# Altium PCB 2023.11.07.HMS.PD.V5.PcbDoc (part 2 of 2)
Units mm, origin at the board's own origin, x right, y up, seen from the top; angles counter-clockwise.
Board outline 110 x 110 mm, 2 copper layers (Top Layer, Bottom Layer); 168 components, 117 nets, 606 pads, 1355 vias.
Unrouted connection lines stored in the file: 4.
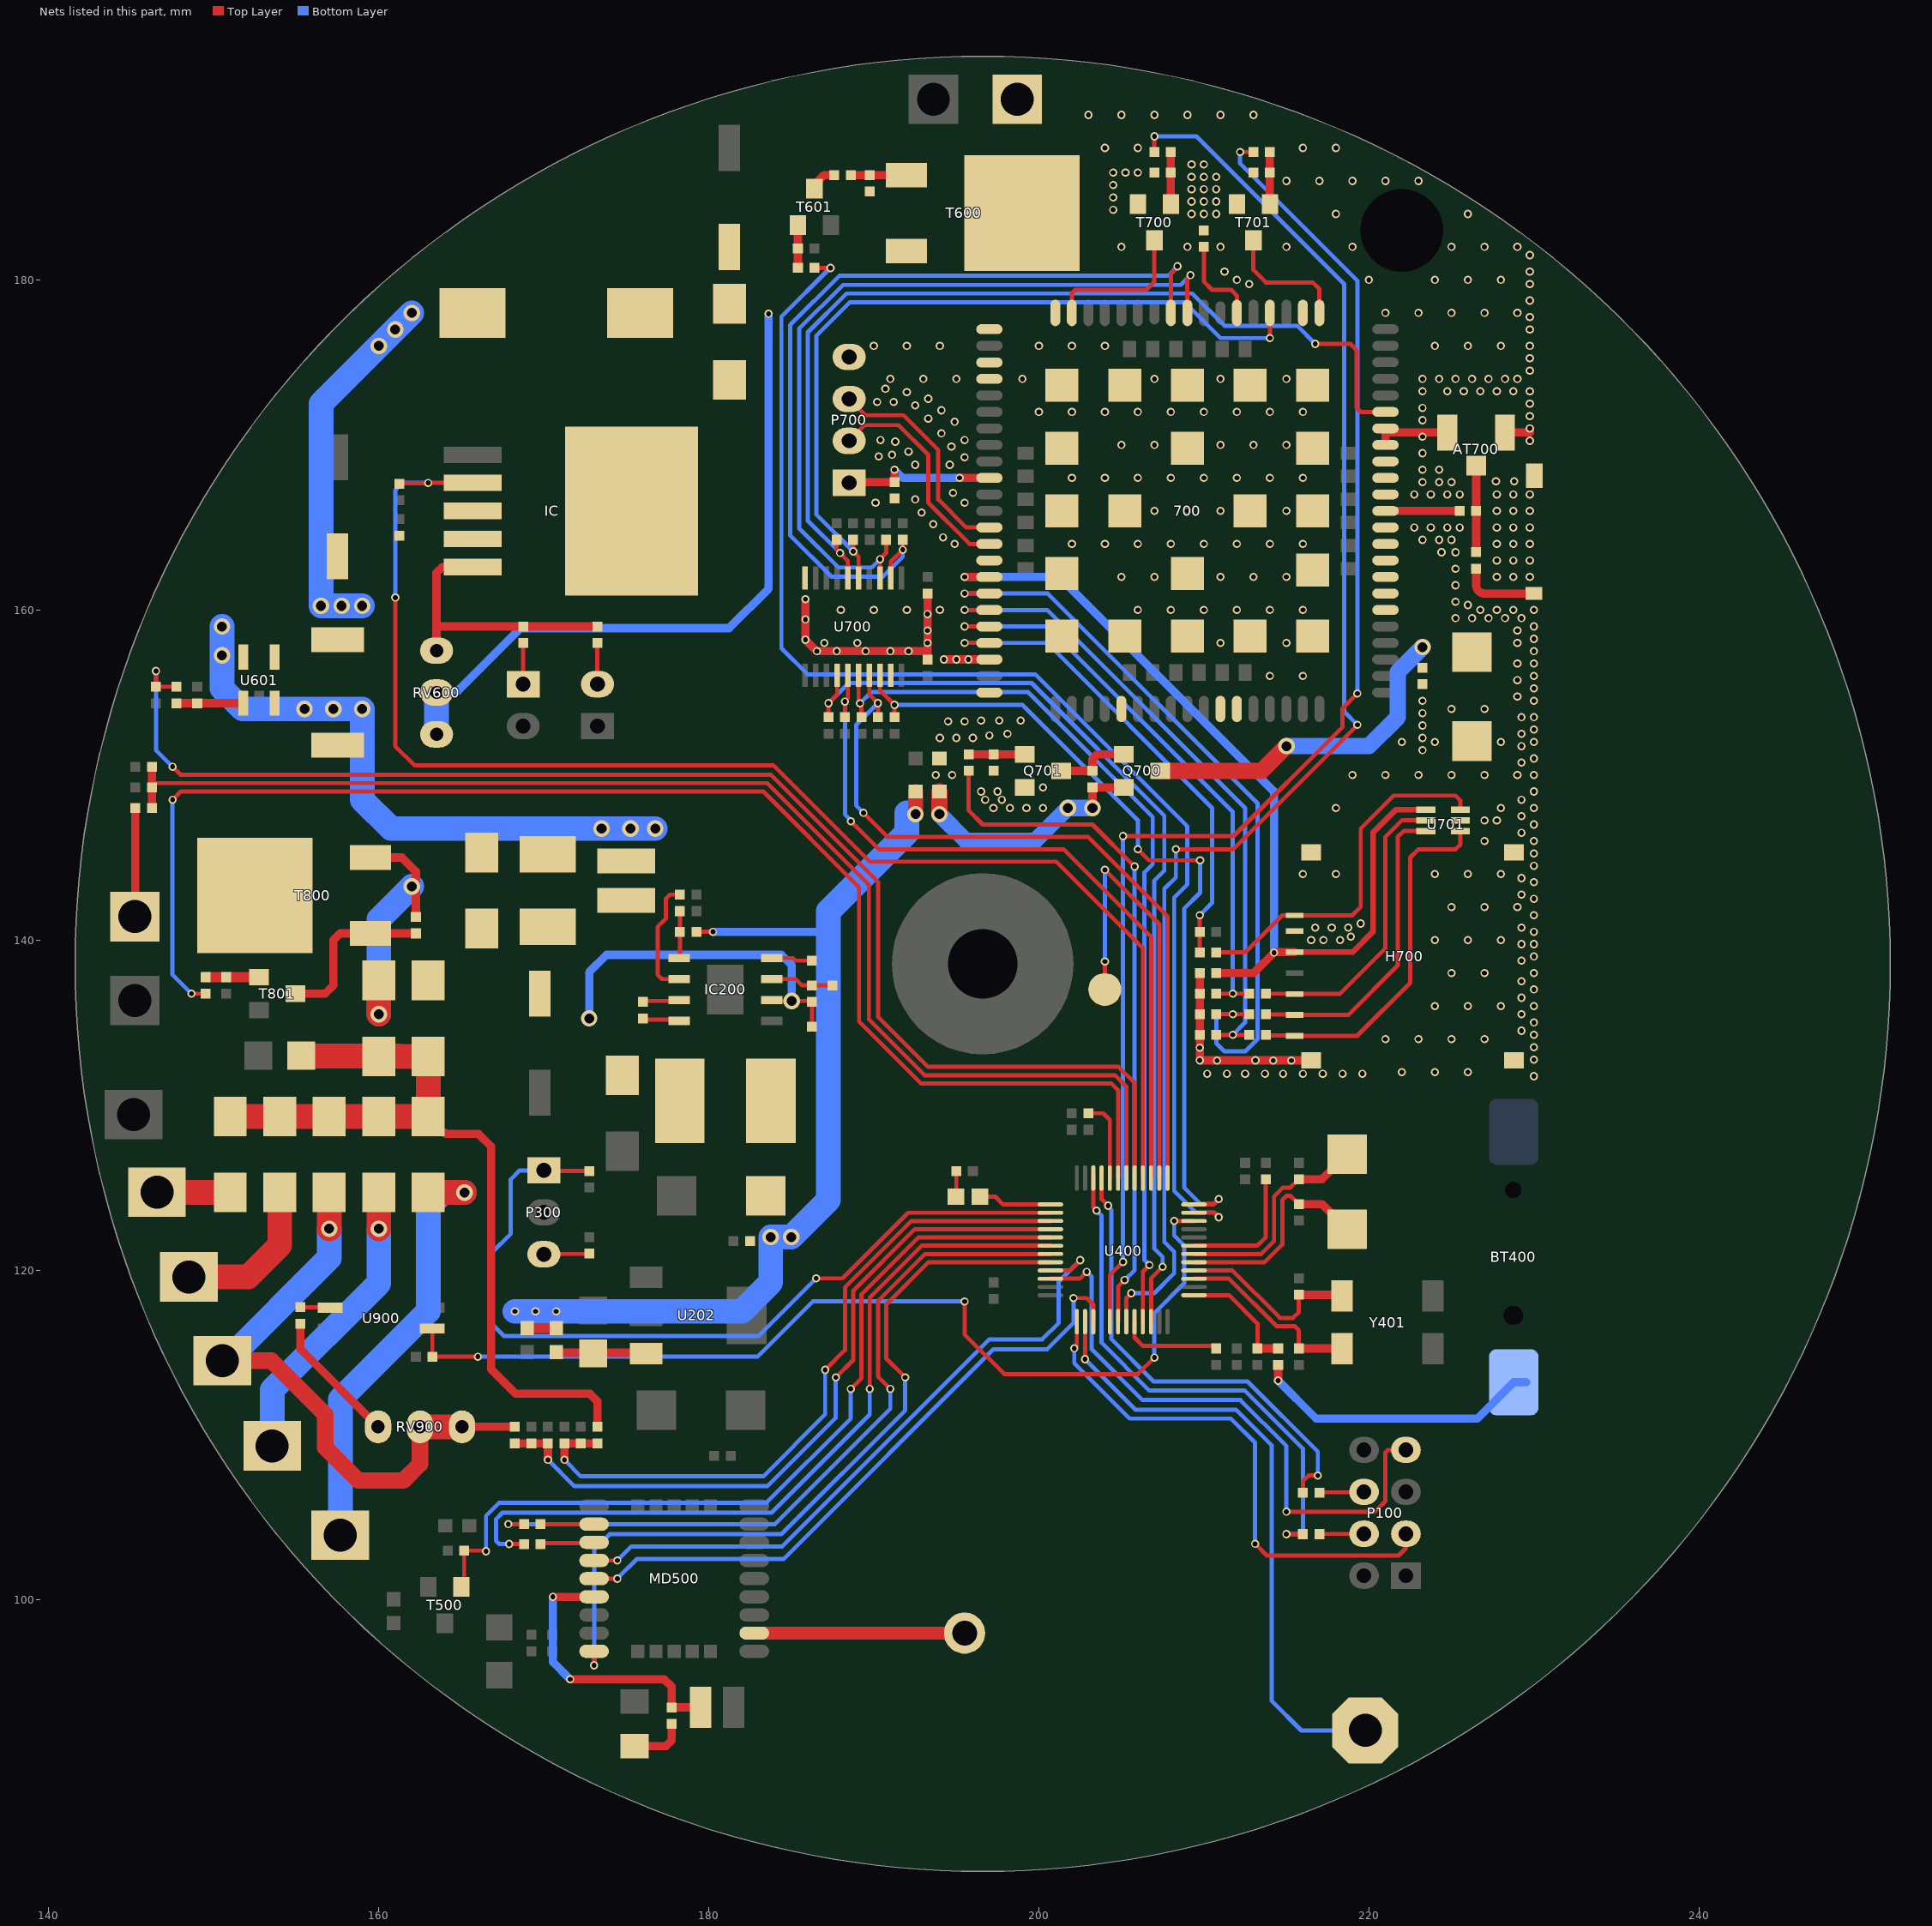
[diagram p2: the nets of this part, all layers, seen from the top]

## Via types
v1: diameter 0.5, hole 0.3, Top Layer to Bottom Layer, tented both sides, 1270 vias
v2: diameter 0.6, hole 0.3, Top Layer to Bottom Layer, tented both sides, 48 vias
v3: diameter 1, hole 0.6, Top Layer to Bottom Layer, tented both sides, 37 vias

## Nets (pads, with @x,y where several pads share a name; then routed paths per layer and width w, separated by ;. In a path a pad name is that pad's centre, name@x,y a point inside that pad or via, vN(x,y) a via of type N, cw(c..) or ccw(c..) an arc to the next point about the centre after c; other vN are vias at no path point) (continued)
GSM.GND: 700.2 700.17 700.18 700.29 700.39 700.45 700.46 700.54 700.58 700.59 700.61 700.62 700.63 700.64 700.65 700.69 700.70 700.71 700.72 700.73 700.74 700.75 700.76 700.77 700.78 700.79 700.80 700.81 700.82 700.83 700.84 700.85 700.86 700.87 700.88 700.89 700.91 700.92 700.94 AT700.2 AT701.2 C701.2 C703.1 C704.1 C705.1 C706.1 C707.1 C708.1 C709.1 C730.2 H700.5 L701.2 P700.4 Q701.2 R700.1 R707.1 R709.2 R711.2 T700.2 T701.2 U700.10 U700.19 U701.2 | length 35.2
  Top Layer w0.5: v1(185.85,160.65) v1(185.85,158.2) v1(186.55,157.5) v1(191,157.5) 193.2,157.5 193.25,157.55 ; C705.1@193.25,157 193.25,157.55 ; C704.1@193.25,161 193.25,157.55 ; v1(194.25,157) 700.92@197,157 ; C706.1@209.75,138 C707.1@209.75,136.75 C709.1@209.75,135.5 C708.1@209.75,134.25 v1(209.75,132.71) H700.5@216.5,132.71 ; 700.64@221,170 221,170.75 AT700.2@224.75,170.75 ; AT700.2@228.25,170.75 229.75,170.75 v1(229.75,171)
  other v1: 230,131.75 210.2,131.9 211.4,131.9 212.5,131.9 213.7,131.9 214.8,131.9 216,131.9 217.2,131.9 218.4,131.9 219.6,131.9 222,132 224,132 226,132 210.8,132.7 214.2,132.7 215.3,132.7 213.125,132.71 230,132.75 209.75,133.48 230,133.5 221,134 223,134 225,134 227,134 230,134.25 229.25,134.5 230,135 229.25,135.5 224,136 226,136 228,136 230,136 229.25,136.5 230,137 229.25,137.5 225,138 227,138 230,138 229.25,138.75 230,139 229.25,139.75 230,139.75 216.5,140 217.25,140 218.25,140 224,140 226,140 228,140 218.9,140.2 230,140.5 216.75,140.75 217.75,140.75 218.75,140.75 229.25,140.75 219.5,141 230,141.5 225,142 227,142 229,142 230,142.5 229.25,142.75 230,143.5 229.25,143.75 216,144 218,144 224,144 226,144 228,144 230,144.5 230,145.25 227,146 230,146 229.25,146.5 230,147 227,147.25 227.75,147.25 229.25,147.5 197.25,148 198.25,148 199.25,148 200.25,148 218,148 228,148 230,148 196.75,148.5 197.75,148.5 229.25,148.5 196.5,149 197.5,149 230,149 200.25,149.25 193.75,150 194.75,150 219,150 221,150 223,150 225,150 227,150 229,150 230,150 229.25,150.75 230,151 223.25,151.5 229.25,151.75 222,152 224,152 228,152 230,152 194,152.25 195,152.25 196,152.25 223.25,152.25 197,152.4 198.1,152.5 229.25,152.5 230,152.75 223.25,153 194.5,153.25 195.5,153.25 196.5,153.3 197.6,153.3 198.9,153.3 229.25,153.5 230,153.5 223.25,153.75 225,154 227,154 223.25,154.5 230,154.5 229,154.75 230,155.25 229,155.75 214,156 216,156 230,156 229,156.75 230,156.75 195,157 195.725,157 187.75,157.5 189.5,157.5 192.1,157.5 230,157.5 187,158 189,158 193.25,158 211,158 215,158 229,158 230,158.25 193.25,158.75 229,158.75 230,159 185.85,159.425 225.25,159.5 226.25,159.5 227.25,159.5 228.25,159.5 229.25,159.5 193.25,159.75 188,160 190,160 192,160 194,160 206,160 208,160 210,160 212,160 214,160 216,160 226.75,160 227.75,160 228.75,160 230,160 226,160.3 225.25,160.5 225.25,161.5 205,162 207,162 211,162 213,162 215,162 227.75,162 228.75,162 229.75,162 225.25,162.5 227.75,163 228.75,163 229.75,163 224.4,163.5 225.25,163.5 194.9,164 202,164 204,164 206,164 208,164 210,164 212,164 214,164 216,164 227.75,164 228.75,164 229.75,164 223.25,164.25 224.25,164.25 225,164.25 194.2,164.4 222.75,165 223.75,165 224.75,165 225.5,165 227.75,165 228.75,165 229.75,165 193.6,165.2 192.9,165.9 207,166 209,166 211,166 215,166 227.75,166 228.75,166 229.75,166 190.1,166.5 195.5,166.5 192.5,166.7 222.75,167 223.75,167 224.75,167 225.5,167 227.75,167 228.75,167 229.75,167 194.8,167.1 223.25,167.75 224.25,167.75 225,167.75 227.7,167.8 228.8,167.8 202,168 204,168 206,168 208,168 210,168 212,168 214,168 216,168 223.25,168.5 224.25,168.5 192.5,168.8 194.6,168.8 195.5,169.25 190.3,169.3 191.1,169.4 223.25,169.5 192.1,169.6 194.7,169.9 205,170 207,170 211,170 213,170 215,170 191.3,170.2 229.75,170.25 190.4,170.3 195.5,170.3 223.25,170.5 194.1,170.7 194.9,171.4 223.25,171.5 193.3,171.6 229.75,171.75 200,172 202,172 204,172 206,172 208,172 210,172 212,172 214,172 216,172 194.1,172.1 223.25,172.25 192.5,172.4 229.75,172.5 190.2,172.6 191.2,172.6 193.3,172.8 192,173.2 223.25,173.25 224.75,173.25 225.75,173.25 226.75,173.25 227.75,173.25 228.75,173.25 229.75,173.25 190.7,173.4 191,174 193,174 195,174 199,174 207,174 211,174 215,174 223.25,174 224.25,174 225.25,174 226.25,174 227.25,174 228.25,174 229,174 229.75,174.5 229.75,175.25 190,176 192,176 194,176 200,176 202,176 204,176 224,176 226,176 228,176 229.75,176 229.75,177 229.75,177.75 221,178 223,178 225,178 227,178 229,178 229.75,178.75 212.75,179.75 229.75,179.75 212,180 220,180 224,180 226,180 228,180 211.25,180.5 229.75,180.5 229.75,181.5 205,182 209,182 211,182 215,182 219,182 225,182 227,182 229,182 209.25,184 210,184 210.75,184 218,184 226,184 204.5,184.25 209.25,184.75 210,184.75 210.75,184.75 204.5,185 209.25,185.5 210,185.5 210.75,185.5 204.5,185.75 215,186 217,186 219,186 221,186 223,186 209.25,186.25 210,186.25 210.75,186.25 204.5,186.5 205.25,186.5 206,186.5 209.25,187 210,187 204,188 206,188 216,188 218,188 203,190 205,190 207,190 209,190 211,190 213,190
GSM.PWR: L700.2 Q700.2 R705.2 | length 15.3
  Top Layer w0.5: v3(203.25,148) 203.25,149.25 Q700.2@205.15,149.25
  Top Layer w1: v3(193.973,147.627) L700.2@193.973,149
  Bottom Layer w1: v3(193.973,147.627) 195.6,146 199.75,146 v3(201.75,148) v3(203.25,148)
GSM.PWRKEY: 700.1 T701.3 | length 7.7
  Top Layer w0.254: T701.3@213,182.4 213,180.6 213.75,179.85 216.6,179.85 217,179.45 700.1@217,178
GSM.RESET: 700.16 T700.3 | length 9
  Top Layer w0.254: 700.16@202,178 202,179.2 202.2,179.4 206.5,179.4 207,179.9 T700.3@207,182.4
GSM.RI: 700.4 R717.1 U700.5 | length 47.2
  Top Layer w0.254: R717.1@188.75,164.25 v1(188.75,163.55) 189.075,163.225 U700.5@189.075,161.95 ; v1(214,176.475) 700.4@214,178
  Bottom Layer w0.254: v1(188.75,163.55) 186.525,165.775 186.525,176.628 188.547,178.65 208.828,178.65 211.003,176.475 v1(214,176.475)
GSM.Status: 700.66 R718.1 U700.6 | length 57.8
  Top Layer w0.254: R718.1@187.75,164.25 187.75,163.65 v1(187.95,163.45) 188.425,162.975 U700.6@188.425,161.95 ; v1(216.75,176.125) 218.875,176.125 219.25,175.75 219.25,172.25 219.5,172 700.66@221,172
  Bottom Layer w0.254: v1(187.95,163.45) 186,165.4 186,176.825 188.35,179.175 209.3,179.175 211.25,177.225 215.65,177.225 v1(216.75,176.125)
GSM.VBAT: 700.55 700.56 700.57 C703.2 C730.1 Q700.3 | length 20.6
  Top Layer w1: Q700.3@207.35,150.25 213.5,150.25 v3(215,151.75)
  Bottom Layer w1: v3(215,151.75) 220,151.75 221.75,153.5 221.75,156.25 v3(223.25,157.75)
LED: D400.2 U400.25 | length 4.5
  Top Layer w0.254: D400.2@196.425,124.45 197.35,124.45 197.825,123.975 U400.25@200.7,123.975
LED_PWR: C600.1 D600.2 R602.2 RV600.2 RV600.3 T600.3 | length 41.9
  Bottom Layer w0.5: RV600.2@163.5,155 163.596,155.096 164.796,155.096 168.6,158.9 181.225,158.9 183.625,161.3 v1(183.625,177.95)
  Bottom Layer w1.5: RV600.3@163.5,152.46 RV600.2@163.5,155
LED_VCC: C601.2 C602.1 IC.4 L601.1 R603.2 U601.4 | length 22.5
  Bottom Layer w1.5: v3(159,160.25) v3(157.75,160.25) v3(156.5,160.25) 156.5,172.5 v3(162,178)
  other v3: 160,176 161,177
Net700_60: 700.60 C700.2 | length 4.5
  Top Layer w0.5: 700.60@221,166 C700.2@225.5,166
Net`_2: `.2 P300.3 | length 2.8
  Top Layer w0.254: P300.3@170,120.96 170.02,120.98 172.73,120.98 `.2@172.75,121
NetAT500_1: AT500.1 MD500.11 | length 12.8
  Top Layer w0.8: MD500.11@182.75,98 AT500.1@195.5,98
NetAT700_1: AT700.1 C700.1 R777.2 | length 8
  Top Layer w0.35: C700.1@226.5,166 AT700.1@226.5,168.75
  Top Layer w0.5: R777.2@226.5,163.5 C700.1@226.5,166 AT700.1@226.5,168.75
NetAT701_1: AT701.1 R777.1 | length 4.8
  Top Layer w0.5: R777.1@226.5,162.5 226.5,161.5 ccw(c227,161.5) 227,161 AT701.1@230,161
NetC200_1: C200.1 D200.2 IC200.8 L201.1 | length 2.3
  Top Layer w0.254: C200.1@176,135.25 176.077,135.173 178.119,135.173 IC200.8@178.196,135.095
NetC200_2: C200.2 IC200.7 | length 2.2
  Top Layer w0.254: C200.2@176,136.25 176.057,136.308 178.139,136.308 IC200.7@178.196,136.365
NetC201_2: C201.2 L202.2 U202.3 | length 5.5
  Top Layer w0.5: L202.2@170.75,115.027 170.789,114.989 176.163,114.989 U202.3@176.202,114.95
NetC204_1: C204.1 C205.2 IC200.2 L200.2 R200.2 | length 21.9
  Top Layer w0.254: IC200.2@183.803,136.365 183.861,136.307 v3(185.027,136.307) 186.192,136.307 R200.2@186.25,136.25 C205.2@186.25,134.75
  Bottom Layer w0.5: v3(172.75,135.25) 172.75,138.05 173.8,139.1 184.4,139.1 185.027,138.473 v3(185.027,136.307)
NetC503_1: C503.1 MD500.6 R502.1 | length 17.3
  Top Layer w0.5: v1(170.55,100.2) MD500.6@173.05,100.2 ; v1(171.6,95.2) 177.3,95.2 177.75,94.75 R502.1@177.75,93.5 C503.1@179.5,93.5
  Bottom Layer w0.5: v1(170.55,100.2) 170.55,96.25 v1(171.6,95.2)
NetC603_2: C603.2 R606.2 U400.17 | length 85.2
  Top Layer w0.254: v1(146.5,156.3) C603.2@146.5,155.35 R606.2@147.75,155.35 ; v1(147.5,150.5) 147.984,150.016 148.4,150.016 183.484,150.016 183.759,150.016 190.25,143.525 190.25,135.35 193.284,132.316 204.821,132.316 205.8,131.337 U400.17@205.8,125.575
  Bottom Layer w0.254: v1(146.5,156.3) 146.5,151.5 v1(147.5,150.5)
NetC801_2: C801.2 R800.1 R803.2 U400.27 | length 43.1
  Top Layer w0.254: v1(187.052,113.952) 188.25,115.15 188.25,118.943 192.282,122.975 U400.27@200.7,122.975
  Top Layer w0.5: v1(171.25,108.5) R803.2@171.25,109.5 R800.1@173.25,109.5
  Bottom Layer w0.254: v1(171.25,108.5) 172.25,107.5 183.3,107.5 187.052,111.252 v1(187.052,113.952)
NetC803_2: C803.2 R802.1 R804.2 U400.18 | length 79.5
  Top Layer w0.254: R804.2@146.25,149.508 182.992,149.508 183.542,149.508 189.7,143.35 189.7,135.182 193.074,131.808 204.61,131.808 205.3,131.118 U400.18@205.3,125.575
  Top Layer w0.5: R802.1@146.25,148 146.25,148.5 146.25,149.508 C803.2@146.25,150.5
NetC900_2: C900.2 R900.1 R901.2 U400.28 | length 44.5
  Top Layer w0.254: v1(187.696,113.496) 188.75,114.55 188.75,118.736 192.489,122.475 U400.28@200.7,122.475
  Top Layer w0.5: R900.1@168.25,109.5 R901.2@170.25,109.5 v1(170.25,108.5)
  Bottom Layer w0.254: v1(170.25,108.5) 171.85,106.9 183.549,106.9 187.696,111.048 v1(187.696,113.496)
NetD400_1: D400.1 R404.2 | length 1.6
  Top Layer w0.254: D400.1@194.975,124.45 195,124.475 R404.2@195,126
NetD500_2: D500.2 R502.2 | length 3.4
  Top Layer w0.5: D500.2@175.5,91.15 177.4,91.15 177.75,91.5 R502.2@177.75,92.5
NetD600_1: D600.1 IC.3 IC.6 L601.2
NetD800_2: D800.2 R801.2 T800.3 | length 16.5
  Top Layer w0.5: T800.3@159.5,145 161.4,145 162.25,144.15 R801.2@162.25,141.4
  Top Layer w1.5: v3(160,135.5) D800.2@160,137.55
  Bottom Layer w1.5: v3(160,135.5) 160,141.25 v3(162,143.25)
NetD900_1: D900.1 T900.1 | length 4.4
  Top Layer w1.5: T900.1@146.558,124.714 146.565,124.707 150.993,124.707 D900.1@151,124.7
NetD902_1: D902.1 T901.1 | length 9.5
  Top Layer w1.5: T901.1@148.488,119.583 152.083,119.583 154,121.5 D902.1@154,124.7
NetD905_1: D905.1 T903.1 | length 18
  Top Layer w1.5: v3(160,122.5) D905.1@160,124.7
  Bottom Layer w1.5: T903.1@153.543,109.347 153.543,112.743 160,119.2 v3(160,122.5)
NetD906_1: D906.1 T904.1 | length 26.9
  Top Layer w1.5: D906.1@163,124.7 v3(165.2,124.7)
  Bottom Layer w1.5: T904.1@157.671,103.937 157.671,112.17 163,117.5 163,123.821 163.879,124.7 v3(165.2,124.7)
NetH700_2: H700.2 R712.2 U701.5 | length 18
  Top Layer w0.254: R712.2@213.75,136.75 215.48,136.75 H700.2@215.5,136.73 218.23,136.73 221,139.5 221,146.25 222,147.25 U701.5@223.45,147.25
NetH700_3: H700.3 R713.2 U701.1 | length 21.9
  Top Layer w0.254: R713.2@213.75,134.25 213.78,134.22 215.47,134.22 H700.3@215.5,134.19 219.282,134.19 222.5,137.408 222.5,145 223,145.5 225.25,145.5 225.55,145.8 U701.1@225.55,146.6
NetH700_7: H700.7 R715.2 U701.6 | length 18.9
  Top Layer w0.254: R715.2@213.75,135.5 213.77,135.48 215.48,135.48 H700.7@215.5,135.46 218.756,135.46 221.75,138.454 221.75,146.25 222.1,146.6 U701.6@223.45,146.6
NetH700_8: H700.8 R714.2 U701.3 | length 22.2
  Top Layer w0.254: R714.2@210.75,139.25 212.5,139.25 214.74,141.49 H700.8@215.5,141.49 218.99,141.49 219.5,142 219.5,146.75 221.5,148.75 225.25,148.75 225.55,148.45 U701.3@225.55,147.9
NetIC200_3: IC200.3 R200.1 R201.2 | length 3.9
  Top Layer w0.254: IC200.3@183.803,137.635 185.265,137.635 185.65,137.25 R201.2@187.5,137.25
NetIC200_4: IC200.4 R204.2 | length 2.5
  Top Layer w0.254: IC200.4@183.803,138.905 185.095,138.905 185.25,138.75 R204.2@186.25,138.75
NetIC200_5: IC200.5 R202.1 R203.2 | length 2.9
  Top Layer w0.254: IC200.5@178.196,138.905 178.25,138.959 R203.2@178.25,141.75
NetIC200_6: IC200.6 R205.2 | length 7.2
  Top Layer w0.254: IC200.6@178.139,137.692 IC200.6@178.196,137.635 177.165,137.635 176.9,137.9 176.9,140.8 177.4,141.3 177.4,142.5 177.65,142.75 R205.2@178.25,142.75
NetIC_2: IC.2 R620.2 U400.16 | length 86.4
  Top Layer w0.254: v1(161,160.75) 161,151.75 162.175,150.575 183.925,150.575 189.75,144.75 201.05,144.75 206.3,139.5 U400.16@206.3,125.575 ; R620.2@161.25,167.65 161.275,167.675 162.975,167.675 v1(163,167.7) IC.2@165.685,167.7
  Bottom Layer w0.254: v1(161,160.75) 161,167.25 161.45,167.7 v1(163,167.7)
NetIC_5: IC.5 R600.2 R601.2 RV600.1 | length 17.1
  Top Layer w0.5: RV600.1@163.5,157.54 163.5,159 ; IC.5@165.435,162.35 IC.5@165.685,162.6 163.85,162.6 163.5,162.25 163.5,159 ; R600.2@173.25,159 163.5,159
NetMD500_2: MD500.2 R500.1 | length 3.3
  Top Layer w0.254: R500.1@169.8,104.6 MD500.2@173.05,104.6
NetMD500_3: MD500.3 R501.1 | length 3.3
  Top Layer w0.254: R501.1@169.8,103.4 169.85,103.45 173,103.45 MD500.3@173.05,103.5
NetMD500_4: MD500.4 U400.33 | length 40.5
  Top Layer w0.254: MD500.4@173.05,102.4 v1(174.457,102.4) ; U400.33@200.7,119.975 201.875,119.975 v1(202.5,120.6)
  Bottom Layer w0.254: v1(174.457,102.4) 175.307,103.25 184.45,103.25 197,115.8 200.2,115.8 201.2,116.8 201.2,119.3 v1(202.5,120.6)
NetMD500_5: MD500.5 U400.39 | length 39.4
  Top Layer w0.254: MD500.5@173.05,101.3 v1(174.457,101.3) ; v1(202.1,118.3) 202.9,118.3 203.3,117.9 U400.39@203.3,116.875
  Bottom Layer w0.254: v1(174.457,101.3) 175.657,102.5 184.549,102.5 197.249,115.2 200.5,115.2 202.1,116.8 v1(202.1,118.3)
NetMD500_9: MD500.9 U400.32 | length 48.2
  Top Layer w0.254: v1(173.05,96.05) MD500.9@173.05,96.9 ; v1(191.9,113.496) 190.75,114.646 190.75,117.907 193.318,120.475 U400.32@200.7,120.475
  Bottom Layer w0.254: v1@173.05,95.95 v1(173.05,96.05) 173.05,103.05 174,104 184.4,104 191.9,111.5 v1(191.9,113.496)
NetP100_3: P100.3 U400.37 | length 32.2
  Top Layer w0.254: v1(202.146,115.254) 202.3,115.407 U400.37@202.3,116.875 ; v1(213.1,103.408) 213.808,102.7 221.8,102.7 222.24,103.14 P100.3@222.24,104.02
  Bottom Layer w0.254: v1(202.146,115.254) 202.146,114.354 205.5,111 211.635,111 213.1,109.535 v1(213.1,103.408)
NetP100_4: P100.4 R102.1 | length 2.7
  Top Layer w0.254: R102.1@217,104 217.01,104.01 219.69,104.01 P100.4@219.7,104.02
NetP100_6: P100.6 R100.1 | length 2.7
  Top Layer w0.254: R100.1@217,106.5 217.03,106.53 219.67,106.53 P100.6@219.7,106.56
NetP100_7: P100.7 U400.34 | length 35.9
  Top Layer w0.254: U400.34@200.7,119.475 202.475,119.475 v1(202.896,119.896) ; v1(215,105.354) 220.354,105.354 221,106 221,108.951 221.149,109.1 P100.7@222.24,109.1
  Bottom Layer w0.254: v1(202.896,119.896) 203.2,119.591 203.2,115.2 206.275,112.125 212.208,112.125 215,109.333 v1(215,105.354)
NetP300_1: P300.1 R300.1 U400.26 | length 51.4
  Top Layer w0.254: P300.1@170,126.04 170.04,126 R300.1@172.75,126 ; v1(186.5,119.5) 188.1,119.5 192.075,123.475 U400.26@200.7,123.475
  Bottom Layer w0.254: P300.1@170,126.04 168.54,126.04 168,125.5 168,122.2 166.9,121.1 166.9,116.7 167.6,116 183,116 v1(186.5,119.5)
NetP600_1: P600.1 T600.2
NetP601_2: P601.2 R600.1 | length 2.5
  Top Layer w0.254: P601.2@173.25,155.5 R600.1@173.25,158
NetP602_1: P602.1 R601.1 | length 2.5
  Top Layer w0.254: P602.1@168.75,155.5 R601.1@168.75,158
NetQ700_1: Q700.1@205.15,151.25 Q701.3 R705.1 | length 4.6
  Top Layer w0.5: Q701.3@201.35,150.25 203.25,150.25 203.25,150.957 203.543,151.25 Q700.1@205.15,151.25
NetQ701_1: Q701.1@199.15,151.25 R706.1 R707.2 | length 3.4
  Top Layer w0.5: R706.1@195.75,151.25 197.25,151.25 Q701.1@199.15,151.25
NetR100_2: R100.2 U400.21 | length 28.5
  Top Layer w0.254: U400.21@203.8,125.575 203.8,124.3 v1(204.2,123.9) ; R100.2@216,106.5 216,107.2 216.35,107.55 v1(216.9,107.55)
  Bottom Layer w0.254: v1(204.2,123.9) 204.2,123.833 204.4,123.633 204.4,115.809 206.959,113.25 212.65,113.25 216.9,109 v1(216.9,107.55)
NetR102_2: R102.2 U400.22 | length 32
  Top Layer w0.254: U400.22@203.3,125.575 203.3,123.8 v1(203.5,123.6) ; v1(215,104) R102.2@216,104
  Bottom Layer w0.254: v1(203.5,123.6) 203.8,123.3 203.8,115.6 206.7,112.7 212.482,112.7 216,109.182 216,104.3 215.7,104 v1(215,104)
NetR400_2: R400.2 U400.44 | length 6.1
  Top Layer w0.254: U400.44@205.8,116.875 205.8,115.9 206.3,115.4 R400.2@210.75,115.4
NetR401_1: R401.1 U400.7 | length 8.1
  Top Layer w0.254: U400.7@209.4,121.475 213.225,121.475 213.75,122 R401.1@213.75,125.5
NetR402_2: R402.2 R403.2 U400.1 | length 7.3
  Top Layer w0.254: U400.1@209.4,118.475 211.525,118.475 213.25,116.75 R403.2@213.25,115.25
  Top Layer w0.5: R403.2@213.25,115.25 R402.2@214.5,115.25
NetR405_2: R405.2 U400.20 | length 5
  Top Layer w0.254: R405.2@203,129.5 203.9,129.5 204.3,129.1 U400.20@204.3,125.575
NetR500_2: R500.2 U400.31 | length 45.5
  Top Layer w0.254: v1(167.85,104.6) R500.2@168.8,104.6 ; v1(191,112.8) 190.25,113.55 190.25,118.114 193.111,120.975 U400.31@200.7,120.975
  Bottom Layer w0.254: v1(167.85,104.6) 184,104.6 191,111.6 v1(191,112.8)
NetR501_2: R501.2 U400.30 | length 47.7
  Top Layer w0.254: v1(167.9,103.4) R501.2@168.8,103.4 ; v1(189.75,112.8) 189.75,118.322 192.903,121.475 U400.30@200.7,121.475
  Bottom Layer w0.254: v1(167.9,103.4) 167.3,103.4 167.1,103.6 167.1,104.9 167.5,105.3 183.8,105.3 189.75,111.25 v1(189.75,112.8)
NetR503_1: R503.1 T500.1@165,100.8 U400.29 | length 51
  Top Layer w0.254: T500.1@165,100.8 165.175,100.975 R503.1@165.175,103 v1@166.5,103 ; v1(188.6,112.8) 189.25,113.45 189.25,118.529 192.696,121.975 U400.29@200.7,121.975
  Bottom Layer w0.254: v1(166.5,102.962) 166.5,105.1 167.3,105.9 183.5,105.9 188.6,111 v1(188.6,112.8)
NetR602_1: R602.1 R608.1 T600.1 | length 3.4
  Top Layer w0.5: R608.1@188.6,186.35 R602.1@189.75,186.35 T600.1@191.968,186.35
NetR604_1: R604.1 U400.11 | length 81.7
  Top Layer w0.254: R604.1@186.4,180.725 v1(187.375,180.725) ; U400.11@209.4,123.475 210.625,123.475 v1(210.9,123.2)
  Bottom Layer w0.254: v1(187.375,180.725) 187.35,180.725 184.4,177.775 184.4,157.675 185.975,156.1 199.775,156.1 209,146.875 209,143.375 208.2,142.575 208.2,124.8 209.5,123.5 210.6,123.5 v1(210.9,123.2)
NetR604_2: R604.2 R605.2 T601.1@185.4,183.325 | length 2.6
  Top Layer w0.5: R604.2@185.4,180.725 R605.2@185.4,181.9 T601.1@185.4,183.325
NetR606_1: R606.1 R607.2 U601.1 | length 4
  Top Layer w0.5: R606.1@147.75,154.35 R607.2@149,154.35 U601.1@151.8,154.35
NetR608_2: R608.2 T601.3 | length 1.7
  Top Layer w0.5: T601.3@186.4,185.525 186.4,185.775 186.975,186.35 R608.2@187.6,186.35
NetR703_1: R703.1 U400.12 U700.18 | length 50.9
  Top Layer w0.254: U700.18@190.375,156.05 190.375,155.125 v1(191.25,154.25) R703.1@191.25,153.5 ; v1(206,145.5) 206.67,144.83 v1(209.77,144.83) ; U400.12@209.4,123.975 210.575,123.975 v1(210.9,124.3)
  Bottom Layer w0.254: v1(191.25,154.25) 199.009,154.25 206,147.259 v1(206,145.5) ; v1(209.77,144.83) 209.77,142.87 208.8,141.9 208.8,125 209.8,124 210.6,124 v1(210.9,124.3)
NetR704_1: R704.1 U400.13 U700.17 | length 47
  Top Layer w0.254: v1(189.369,147.706) 190.825,146.25 202.975,146.25 207.8,141.425 U400.13@207.8,125.575 ; U700.17@189.725,156.05 189.725,154.875 v1(190.25,154.35) R704.1@190.25,153.5
  Bottom Layer w0.254: v1(189.369,147.706) 189.369,147.709 188.925,148.154 188.925,153.025 v1(190.25,154.35)
NetR706_2: R706.2 U400.42 | length 41.8
  Top Layer w0.254: R706.2@195.75,150.25 195.75,147.85 196.6,147 203.25,147 v1(205.8,144.45) ; U400.42@204.8,116.875 204.8,119 v1(205.2,119.4)
  Bottom Layer w0.254: v1(205.2,119.4) 205.8,120 v1(205.8,144.45)
NetR708_1: R708.1 R709.1 T700.1@208,184.6 | length 3.1
  Top Layer w0.5: T700.1@208,184.6 R709.1@208,186.5 R708.1@208,187.75
NetR708_2: R708.2 U400.43 | length 88.5
  Top Layer w0.254: U400.43@205.3,116.875 205.3,118.3 v1(205.6,118.6) ; R708.2@207,187.75 v1(207,188.7) ; v1(208.3,145.5) 211.778,145.5 219.3,153.022 v1(219.3,153.039)
  Bottom Layer w0.254: v1(205.6,118.6) 207,118.6 208.2,119.8 208.2,121.1 207.6,121.7 207.6,143.1 208.3,143.8 v1(208.3,145.5) ; v1(207,188.7) 209.55,188.7 218.5,179.75 218.5,153.839 v1(219.3,153.039)
NetR710_1: R710.1 R711.1 T701.1@214,184.6 | length 3.1
  Top Layer w0.5: T701.1@214,184.6 R710.1@214,187.75
NetR710_2: R710.2 U400.41 | length 84.8
  Top Layer w0.254: U400.41@204.3,116.875 204.3,119.7 v1(205.1,120.5) ; v1(205.1,146.3) 211.8,146.3 218.4,152.9 218.4,154.039 v1(219.3,154.939) ; v1(212.193,187.75) R710.2@213,187.75
  Bottom Layer w0.254: v1(205.1,120.5) v1(205.1,146.3) ; v1(212.193,187.75) 212.193,187.057 219.3,179.95 v1(219.3,154.939)
NetR720_1: R720.1 U400.45 U700.16 | length 54.9
  Top Layer w0.254: U700.16@189.075,156.05 189.075,154.425 189.25,154.25 R720.1@189.25,153.5 ; U400.45@206.3,116.875 206.3,119.9 v1(206.7,120.3)
  Bottom Layer w0.254: v1(189.163,154.338) 189.85,155.025 199.33,155.025 206.9,147.455 206.9,144.6 206.4,144.1 206.4,120.6 v1(206.7,120.3)
NetR721_1: R721.1 U400.15 U700.15 | length 45.7
  Top Layer w0.254: R721.1@188.25,153.5 v1(188.25,154.45) 188.425,154.625 U700.15@188.425,156.05 ; v1(188.61,147.19) 190.3,145.5 201.5,145.5 206.8,140.2 U400.15@206.8,125.575
  Bottom Layer w0.254: v1(188.25,154.45) 188.25,147.617 188.61,147.256 v1(188.61,147.19)
NetR722_1: R722.1 U400.46 U700.14 | length 58.4
  Top Layer w0.254: R722.1@187.25,153.5 v1(187.25,154.35) 187.775,154.875 U700.14@187.775,156.05 ; U400.46@206.8,116.875 206.8,119.5 v1(207.5,120.2)
  Bottom Layer w0.254: v1(187.25,154.35) 188.475,155.575 199.558,155.575 207.6,147.533 207.6,144.2 207,143.6 207,121.3 207.5,120.8 v1(207.5,120.2)
NetR801_1: R801.1 T800.1 T801.3 | length 10.4
  Top Layer w0.5: T801.3@154.95,136.75 156.75,136.75 157.25,137.25 157.25,140 157.65,140.4 T800.1@159.5,140.4 R801.1@162.25,140.4
NetR805_1: R805.1 U400.19 | length 88.2
  Top Layer w0.254: v1(147.5,148.5) 148,149 148.4,149 182.5,149 183.3,149 189.1,143.2 189.1,135.063 192.863,131.3 204.4,131.3 204.8,130.9 U400.19@204.8,125.575 ; v1(148.65,136.75) R805.1@149.5,136.75
  Bottom Layer w0.254: v1(147.5,148.5) 147.5,137.9 v1(148.65,136.75)
NetR805_2: R805.2 R806.2 T801.1@152.75,137.75 | length 3.3
  Top Layer w0.6: R805.2@149.5,137.75 R806.2@150.75,137.75 T801.1@152.75,137.75
NetR902_2: R902.2 U400.10 U900.3 | length 60.6
  Top Layer w0.254: U900.3@163.246,116.448 163.25,116.444 R902.2@163.25,114.75 v1(166,114.75) ; v1(195.5,118.1) 195.5,116.1 197.9,113.7 206,113.7 v1(207,114.7) ; v1(208.2,122.975) U400.10@209.4,122.975
  Bottom Layer w0.254: v1(166,114.75) 182.95,114.75 186.3,118.1 v1(195.5,118.1) ; v1@207,114.8 207,117.4 208.8,119.2 208.8,121.5 208.2,122.1 v1(208.2,122.975)
NetR905_1: R905.1 U900.1 | length 1.8
  Top Layer w0.254: R905.1@155.25,117.75 155.266,117.734 157.03,117.734 U900.1@157.046,117.718
NetR905_2: R905.2 RV900.1 | length 8.2
  Top Layer w0.5: R905.2@155.25,116.75 155.25,115.21 RV900.1@159.96,110.5
NetT300_1: T300.1 U400.38 | length 37.6
  Top Layer w0.254: v1(202.8,114.6) U400.38@202.8,116.875
  Bottom Layer w0.254: v1(202.8,114.6) 205.875,111.525 211.959,111.525 214.1,109.384 214.1,93.9 215.9,92.1 T300.1@219.775,92.1
NetT400_1: T400.1 U400.14 | length 27.3
  Top Layer w0.254: T400.1@204,137 v1(204,138.7) ; v1(204,144.25) 207.3,140.95 U400.14@207.3,125.575
  Bottom Layer w0.254: v1(204,138.7) v1(204,144.25)
OSC32I: C403.2 U400.3 Y401.1 | length 11.4
  Top Layer w0.254: U400.3@209.4,119.475 211.525,119.475 214.4,116.6 215.5,116.6 215.75,116.35 C403.2@215.75,115.25
  Top Layer w0.5: C403.2@215.75,115.25 218.35,115.25 Y401.1@218.375,115.225
OSC32O: C404.2 U400.4 Y401.4 | length 11.4
  Top Layer w0.254: U400.4@209.4,119.975 211.732,119.975 214.607,117.1 215.4,117.1 215.75,117.45 C404.2@215.75,118.5
  Top Layer w0.5: C404.2@215.75,118.5 218.3,118.5 Y401.4@218.375,118.425
OSCI: C401.2 U400.5 Y400.1 | length 13.4
  Top Layer w0.254: U400.5@209.4,120.475 213.682,120.475 214.75,121.543 214.75,124.25 215,124.5 215.25,124.5 C401.2@215.75,124
  Top Layer w0.5: C401.2@215.75,124 217.15,124 Y400.1@218.675,122.475
OSCO: C400.2 U400.6 Y400.2 | length 13.4
  Top Layer w0.254: U400.6@209.4,120.975 213.475,120.975 214.25,121.75 214.25,124.457 214.793,125 215.25,125 C400.2@215.75,125.5
  Top Layer w0.5: C400.2@215.75,125.5 217.15,125.5 Y400.2@218.675,127.025
SIM.CLK: 700.32 C708.2 R713.1 | length 39.5
  Top Layer w0.254: v1(195.5,160) 700.32@197,160 ; C708.2@210.75,134.25 v1(211.75,134.25) R713.1@212.75,134.25
  Bottom Layer w0.254: v1(195.5,160) 200.5,160 212.5,148 212.5,135 v1(211.75,134.25)
SIM.DATA: 700.31 C709.2 R715.1 | length 46.4
  Top Layer w0.254: v1(195.5,161) 700.31@197,161 ; C709.2@210.75,135.5 v1(211.75,135.5) R715.1@212.75,135.5
  Bottom Layer w0.254: v1(195.5,161) 200.543,161 213.25,148.293 213.25,134 212.5,133.25 211.25,133.25 210.75,133.75 210.75,135.25 211,135.5 v1(211.75,135.5)
SIM.DET: 700.34 R714.1 R716.1 | length 29.7
  Top Layer w0.254: v1(195.5,158) 700.34@197,158 ; R714.1@209.75,139.25 R716.1@209.75,140.5 v1(209.75,141.5)
  Bottom Layer w0.254: v1(195.5,158) 200.5,158 210.5,148 210.5,142.25 v1(209.75,141.5)
SIM.RST: 700.33 C707.2 R712.1 | length 35.4
  Top Layer w0.254: v1(195.5,159) 700.33@197,159 ; C707.2@210.75,136.75 v1(211.75,136.75) R712.1@212.75,136.75
  Bottom Layer w0.254: v1(195.5,159) 200.5,159 211.75,147.75 v1(211.75,136.75)
SIM.VDD: 700.30 C706.2 H700.1 U701.4 | length 55.7
  Top Layer w0.35: H700.1@215.5,139.27 219.02,139.27 220.25,140.5 220.25,146.5 221.65,147.9 U701.4@223.45,147.9
  Top Layer w0.5: v1(195.5,162) 700.30@197,162 ; C706.2@210.75,138 213.023,138 214.293,139.27 H700.1@215.5,139.27
  Bottom Layer w0.5: v1(195.5,162) 201.25,162 214.25,149 v1(214.25,139.235)
SOLAR_TOP: D904.1 R900.2 RV900.2 RV900.3 T902.1 | length 37.6
  Top Layer w0.5: RV900.3@165.04,110.5 R900.2@168.25,110.5
  Top Layer w1: T902.1@150.52,114.503 153.497,114.503 156.75,111.25 156.75,109.25 158.75,107.25 161.5,107.25 162.5,108.25 RV900.2@162.5,110.5
  Top Layer w1.5: v3(157,122.5) D904.1@157,124.7 ; RV900.2@162.5,110.5 RV900.3@165.04,110.5
  Bottom Layer w1.5: T902.1@150.52,114.503 150.77,114.503 157,120.733 v3(157,122.5)
UART2.RX: 700.10 R702.1 U700.2 | length 52.1
  Top Layer w0.254: U700.2@191.025,161.95 191.025,162.925 v1(191.75,163.65) R702.1@191.75,164.25 ; 700.10@208,178 208,180.359 208.4,180.758 v1(208.4,180.825)
  Bottom Layer w0.254: v1(191.75,163.65) 191.75,163.225 190.55,162.025 187.425,162.025 184.925,164.525 184.925,177.27 187.905,180.25 207.825,180.25 v1(208.4,180.825)
UART2.TX: 700.9 R701.1 U700.3 | length 48.1
  Top Layer w0.254: U700.3@190.375,161.95 v1(190.375,163.075) 190.75,163.45 R701.1@190.75,164.25 ; 700.9@209,178 209,180.034 209.187,180.22 v1(209.187,180.287)
  Bottom Layer w0.254: v1(190.375,163.075) 189.875,162.575 187.85,162.575 185.475,164.95 185.475,177.042 188.133,179.7 208.6,179.7 v1(209.187,180.287)
USB.BOOT: 700.6 R700.2 | length 5.5
  Top Layer w0.254: R700.2@210,182 210,179.9 210.5,179.4 211.65,179.4 212,179.05 700.6@212,178
USB.DN: 700.28 P700.2 | length 13.6
  Top Layer w0.254: P700.2@188.5,170.25 189.45,171.2 191.5,171.2 193.3,169.4 193.3,166.5 195.8,164 700.28@197,164
USB.DP: 700.27 P700.3 | length 13.5
  Top Layer w0.254: P700.3@188.5,172.79 189.49,171.8 191.8,171.8 193.9,169.7 193.9,166.7 195.6,165 700.27@197,165
USB.VBUS: 700.24 C701.1 P700.1 | length 9.5
  Top Layer w0.5: P700.1@188.5,167.71 188.54,167.75 C701.1@191.25,167.75 v1(191.25,168.5) ; v1(195.2,168) 700.24@197,168
  Bottom Layer w0.5: v1(191.25,168.5) 191.75,168 v1(195.2,168)
V_BAT: D903.1 P800.1 R802.2 T800.2 | length 6.6
  Top Layer w0.5: P800.1@145.225,141.415 145.25,141.44 R802.2@145.25,148
V_SOLAR: C802.1 D800.1 D900.2 D901.1 D902.2 D904.2 D905.2 D906.2 R800.2 | length 48.6
  Top Layer w0.5: D906.2@163,129.3 163,129.1 163.75,128.35 163.95,128.35 164.05,128.25 166.05,128.25 166.8,127.5 166.8,114 168.3,112.5 172.8,112.5 173.25,112.05 173.25,110.55 R800.2@173.25,110.5
  Top Layer w1.5: D900.2@151,129.3 D902.2@154,129.3 D904.2@157,129.3 D905.2@160,129.3 D906.2@163,129.3 D901.1@163,132.071 ; C802.1@155.3,133 155.325,132.975 161.225,132.975 161.25,132.95 D901.1@162.121,132.95
V_SYSTEM: D901.2 D903.2 F200.1
VBAT: BT400.1 R402.1 | length 17.8
  Top Layer w0.5: v1(214.5,113.3) R402.1@214.5,114.25
  Bottom Layer w0.5: v1(214.5,113.3) 216.8,111 226.575,111 BT400.1@228.775,113.2 BT400.1@229.525,113.2
VIN: F200.2 L200.1 R603.1 U601.3 U601.5 | length 36.7
  Bottom Layer w1.5: v3(150.5,159) v3(150.5,157.25) 150.5,155.25 151.75,154 v3(155.5,154) v3(157.25,154) v3(159,154) 159,148.5 160.75,146.75 v3(173.5,146.75) v3(175.25,146.75) v3(176.75,146.75)
VOUT: C202.2 C203.1 L201.2 L202.1 L203.1 L700.1 R202.2 | length 59.9
  Top Layer w0.254: R202.2@179.25,140.5 v1(180.25,140.5)
  Top Layer w0.6: L203.1@169,116.475 L202.1@170.75,116.475
  Top Layer w0.9: v3(192.525,147.627) L700.1@192.525,149
  Bottom Layer w0.5: v1(180.25,140.5) 187.25,140.5
  Bottom Layer w1.5: v1(168.25,117.5) v1(169.5,117.5) 182,117.5 183.75,119.25 v3(183.75,122) v3(185,122) 187.25,124.25 187.25,140.5 187.25,141.75 192,146.5 192,147.7
  other v1: 170.75,117.5
pads on no net: 700.5 700.7 700.8 700.11 700.12 700.13 700.14 700.19 700.20 700.21 700.22 700.23 700.25 700.26 700.35 700.36 700.37 700.38 700.40 700.41 700.42 700.43 700.44 700.47 700.48 700.49 700.50 700.51 700.52 700.53 700.67 700.68 700.90 700.93 700.95 700.96 700.97 700.98 700.99 700.100 700.101 700.102 700.103 700.104 700.105 700.106 700.107 700.108 700.109 700.110 700.111 700.112 700.113 700.114 700.115 700.116 700.117 700.118 700.119 700.120 700.121 700.122 700.123 700.124 BT400. H700.6 MD500.7 MD500.13 MD500.14 MD500.15 MD500.16 MD500.17 MD500.18 MD500.19 MD500.20 MD500.21 MD500.22 MD500.23 MD500.24 MD500.25 MD500.26 MD500.27 P100.1 P100.2 Q700.1@206.25,151.266 Q701.1@200.25,151.266 T500.1@165.016,99.7 T601.1@185.384,184.425 T700.1@208.016,183.5 T701.1@214.016,183.5 T801.1@153.85,137.766 U400.0 U400.2 U400.40 U700.7 U700.8 U700.9 U700.11 U700.12 U700.13 U701.0 Y401.2 Y401.3

## Polygon pours and split planes (outlines as drawn)
GSM.GND on Top Layer "GSM.GND_L01_P000" (solid, remove dead copper, pour order 5): 230.4,131.4 207.9,131.4 207.9,147 193.4,147 193.4,151.8 184.8,151.8 184.8,177.3 195.4,177.3 195.4,180.5 200.6,180.5 200.6,193.4 230.4,193.4 230.4,181.9
GND on Top Layer "GND_L02_P003" (solid, remove dead copper, pour order 8): 230.4,131.4 230.4,83.5 141.5,83.5 141.5,193.5 197,193.5 197,177.27 184.925,177.27 184.925,151.8 193.4,151.8 193.4,147 207.9,147 207.9,131.4
GSM.GND on Bottom Layer "GSM.GND_L02_P001" (solid, remove dead copper, pour order 6): 230.4,131.4 230.4,193.4 200.6,193.4 200.6,180.5 195.4,180.5 195.4,177.27 184.925,177.27 184.925,151.8 193.4,151.8 193.4,147 207.9,147 207.9,131.4
GND on Bottom Layer "GND_L02_P003" (solid, remove dead copper, pour order 7): 230.4,131.4 230.4,83.5 141.5,83.5 141.5,193.5 197,193.5 197,177.27 184.925,177.27 184.925,151.8 193.4,151.8 193.4,147 207.9,147 207.9,131.4

## Keep-outs
Keep-Out Layer:
  circle w0.254: c196.596,138.557 r55

## Other copper
Top Layer:
  region net GPS_PWR: 163.4,99.6 163.5,99.7 163.5,102.3 163.8,102.6 164.4,102.6 164.5,102.7 164.5,105 164.4,105.1 162.3,105.1 161.9,104.7 161.9,101.2 161.6,100.9 160.4,100.9 160.2,100.7 160.2,99.8 160.4,99.6
  region net V_SOLAR: 164,128 164.25,128.25 164.25,134 164,134.25 154.75,134.25 154.375,133.875 154.375,131.375 153.75,130.75 150,130.75 149.75,130.5 149.75,128.25 150,128
  region net V_BAT: 144,146.25 143.5,145.75 143.5,139.5 144,139 156,139 156.25,139.25 156.25,146 156,146.25
  region net V_SYSTEM: 172,139.25 166,139.25 164.25,137.5 164.25,136.5 164,136.25 162,136.25 161.75,136.5 161.75,138.75 162,139 163.25,140.25 163.25,141.25 164,142 172,142 172.25,141.75 172.25,139.5
  region net V_BAT: 167.5,148 167,148.5 149.5,148.5 147,146 148.5,144.5 155.5,144.5 157.25,146.25 163.75,146.25 164,146 164,144.25 164.25,144 167.25,144 167.5,144.25
  region net NetD800_2: 160.25,145.75 162.25,145.75 162.75,145.25 162.75,141.3 162.55,141.1 161.425,141.1 161.125,141.4 161.125,143.325 160.75,143.7 158.475,143.7 158.1,144.075 158.1,145.65 158.225,145.775
  region net GPS_VCC: 160.825,97.575 160.4,98 160.4,99.075 160.55,99.225 170.775,99.225 171.6,98.4 173.825,98.4 173.95,98.275 173.95,97.65 173.875,97.575
  region net 3.3V: 181.025,108.175 181.1,108.1 183.175,108.1 183.525,108.45 183.525,118.975 183.4,119.1 181.15,119.1 181.025,118.975
  region net VOUT: 169.225,116.025 167.775,116.025 167.7,116.1 167.7,117.9 167.875,118.075 171,118.075 171.2,117.875 171.2,116.075 171.125,116
  region net 3.3V: 191.5,155 191.6,154.9 193.2,154.9 193.6,155.3 193.6,156.3 192.3,156.3 191.8,156.8 191.5,156.8
  region net 1.8V: 193.5,162.7 193.7,162.5 193.7,161.8 193.6,161.7 192.1,161.7 192,161.6 192,161.3 191.9,161.2 191.5,161.2 191.5,162.7
  region net GSM.PWR: 204.4,149.8 204.2,149.6 202.7,149.6 202.6,149.5 202.6,147.9 203,147.5 205.65,147.5 205.8,147.65 205.8,149.7 205.7,149.8
  region net 3.3V: 196.55,118.6 196.325,118.375 196.325,116.725 196.525,116.525 198.825,116.525 199.1,116.8 200.65,118.35 201.425,118.35 201.475,118.4 201.475,118.55 201.425,118.6
  region net 3.3V: 202.425,128.75 202.25,128.925 200.05,128.925 199.7,128.575 199.7,126.5 200.55,125.65 201.75,125.65 202.175,125.225 202.175,124.8 202.225,124.75 202.375,124.75 202.425,124.8
  region net GND: 202.675,128.8 202.75,128.875 203.825,128.875 203.95,128.75 203.95,126.95 203.8,126.8 203.25,126.8 202.925,126.475 202.925,124.875 202.825,124.775 202.775,124.775 202.675,124.875
  region net 3.3V: 199.7,126.5 199.7,126.3 200,126 200.5,126
  region net 3.3V: 200.55,125.65 195.75,125.65 195.7,125.7 195.7,126.275 195.9,126.075 200.125,126.075
  region net GND: 194.6,118.85 194.4,119.05 194.4,119.85 194.6,120.05 199.25,120.05 199.6,119.7 199.6,119.325 199.825,119.1 201.5,119.1 201.525,119.075 201.3,118.85 201.175,118.85
  region net GND: 152.45,151.15 152.65,150.95 153.05,151.35 153.05,155.125 152.95,155.225 152.55,155.225 152.45,155.125
  region net GSM.GND: 185.625,163.425 185.8,163.6 186,163.4 186,160.15 185.925,160.075 185.675,160.325 185.625,160.325
  region net GSM.GND: 190.85,158.025 191.2,158.375 191.2,155.3 191.175,155.275 190.9,155.275 190.85,155.325
  region net LED_VCC: 156.575,164.8 155.825,164.05 155.825,157.375 155.9,157.3 159.35,157.3 159.625,157.575 159.625,162.3 161.125,163.8 167.425,163.8 167.5,163.875 167.5,164.75 167.45,164.8
  region net LED_VCC: 159.35,156.375 159.625,156.65 159.625,157.575 159.2,158 153.4,158 153.325,157.925 153.325,156.45 153.4,156.375
  region net LED_VCC: 155.1,157.775 156.1,158.775 156.7,158.775 156.7,157.6 156.3,157.2
  region net VIN: 153.4,150.975 153.6,150.775 159.2,150.775 159.575,151.15 159.575,155.025 159.475,155.125 153.4,155.125
  region net VIN: 150,156.3 149.7,156.6 149.7,159.7 150,160 152,160 152.2,159.8 152.2,156.5 152,156.3
  region net VIN: 168.6,144 177.7,144 178.3,144.6 178.3,147.7 178,148 168.5,148 168.3,147.8 168.3,144.3
  region net LED_VCC: 164.85,179.575 162.025,179.575 159.4,176.95 159.4,174.95 159.85,174.5 167.125,174.5 167.825,175.2 167.825,179.375 167.6,179.6
  region net NetD600_1: 169.85,166.525 170.725,167.4 170.725,171.85 173.725,174.85 173.725,179.525 173.9,179.7 177.85,179.7 178.275,179.275 178.275,175.55 178.625,175.2 182.475,175.2 182.6,175.075 182.6,161.275 182.05,160.725 171.25,160.725 170.725,161.25 170.725,164.575 169.825,165.475 163.9,165.475 163.8,165.575 163.8,166.4 163.925,166.525
  region net LED_PWR: 180.2,183.1 180.7,183.6 182.6,183.6 182.9,183.3 182.9,180.5 183.4,180 189.6,180 190.4,180.8 190.4,182.6 190.7,182.9 193.5,182.9 193.5,177.9 192.9,177.3 180.2,177.3
  region net LED_PWR: 188.9,180.7 187.9,179.7 188.5,179.1 192.3,179.1 193.5,180.3 193.5,184.3 193.1,184.7 191.075,184.7 190.075,185.7 188.9,185.7
  region net NetP600_1: 195.4,187.7 196.3,188.6 196.3,192.3 196.9,192.9 200.6,192.9 201.1,192.4 201.1,189 202.5,187.6 202.5,180.5 202.4,180.4 195.5,180.4 195.4,180.5
  region net GSM.GND: 200.496,148.5 196.138,148.5 196.138,149.4 200.496,149.4
  pour cut-out: 200.004,152.004 195.196,152.004 195.196,150.496 200.004,150.496
  pour cut-out: 206.004,152.004 202.204,152.004 202.204,149.437 206.004,149.437
  pour cut-out: 206.496,151.004 206.059,151.004 206.059,149.437 206.496,149.437
  pour cut-out: 193.5,149.729 195.362,149.729 195.362,149.437 193.5,149.437
  pour cut-out: 201.976,180.141 193.868,180.141 193.759,180.25
  pour cut-out: 157.764,139.787 157.764,134.509 161.901,134.509 161.901,139.886 157.863,139.886
  pour cut-out: 155.804,135.996 155.804,136.25 157.75,136.25 157.75,135.996
  pour cut-out: 164.254,126.154 148.562,126.154 148.562,122.96 164.254,122.96 164.254,125.713
  pour cut-out: 180.766,116.489 167.314,116.489 167.314,114.065 180.766,114.065
  pour cut-out: 171.099,118.314 167.314,118.314 167.314,116.489 171.459,116.489
  pour cut-out: 172.024,105.154 163.743,105.154 163.743,98.659 172.024,98.659
  pour cut-out: 180.404,95.004 178.304,95.004 178.304,91.996 180.404,91.996
  pour cut-out: 173.804,159.554 173.804,159.712 165.824,159.712 165.824,159.5 166.25,159.5
  pour cut-out: 164.014,159.514 164.014,165.216 170.941,165.216 170.941,159.514 165.266,159.514
  pour cut-out: 162.496,167.8 162.496,165 167.689,165 167.689,167.8
  pour cut-out: 159.884,156.65 159.884,150.25 153.146,150.25 153.146,156.65
  pour cut-out: 155.218,158.259 149.554,158.259 149.554,154.864 153.146,154.864 153.146,155.366
  region net GND: 153.141,154.864 153.141,155.225 152.354,155.225 152.354,154.864
  pour cut-out: 148.304,155.904 145.946,155.904 145.946,154.796 148.304,154.796
  pour cut-out: 151.246,153.836 147.125,153.836 147.125,154.904 149.554,154.904
  pour cut-out: 165.5,183.5 165.5,172.75 176,172.75 176,183.5
  pour cut-out: 167.689,168.454 162.496,168.454 162.496,165.059
  pour cut-out: 194.221,123.863 194.221,126.565 197.986,126.565 197.986,124.363
  pour cut-out: 202.752,128.946 204,128.946 204,129.75 202.752,129.75
  pour cut-out: 220.129,128.479 220.129,121.021 216.304,121.021 216.304,128.479
  pour cut-out: 216.304,119.629 224.779,119.629 224.779,114.021 216.304,114.021
  pour cut-out: 162.986,158.551 162.986,163.541 164.014,163.541 164.014,158.551
  pour cut-out: 154.096,135.996 154.096,145.864 160.866,145.864 160.866,135.996
  pour cut-out: 148.146,136.65 148.146,138.75 154.25,138.75 154.25,137.185 148.75,137.185 148.75,137.254
  pour cut-out: 192.407,157.059 192.407,156.5 191.25,156.5 191.25,157.059
  region net NetC200_1: 175.7,133.6 176.6,132.7 176.6,127.8 176.8,127.6 179.7,127.6 179.8,127.7 179.8,134.4 178.6,135.6 175.7,135.6
  region net VOUT: 182.2,132.8 182.4,133 185.9,133 186.1,132.8 186.1,121.4 186,121.3 182.3,121.3 182.2,121.4
  region net NetC204_1: 186.475,136.625 186.55,136.55 186.55,134.3 186.525,134.275 185.875,134.275 185.8,134.35 185.8,135.625 185.55,135.875 183.175,135.875 183.125,135.925 183.125,136.6 183.15,136.625
  region net NetC204_1: 173.2,138.95 172.75,138.5 169.25,138.5 169,138.25 169,135.2 169.2,135 173,135 174.8,136.8 174.8,139.6 176.8,141.6 176.8,143.1 176.7,143.2 173.3,143.2 173.2,143.1
  pour cut-out: 182.899,139.413 182.899,135.518 185.541,135.518 185.541,139.413
  pour cut-out: 177.696,142.304 177.696,139.946 179.804,139.946 179.804,141.054 178.804,141.054 178.804,142.304
  pour cut-out: 165.5,174.241 154,174.241 154,183.5 165.5,183.5
  region net GSM.PWR: 203,147.5 201.05,147.5 200.95,147.6 200.95,148.475 201.075,148.6 202.5,148.6 202.6,148.7
  pour cut-out: 176.7,133.6 176.7,126.9 185.4,126.9 185.4,133.6
  region net GSM.GND: 196.138,148.5 196.138,148.362 197,147.5 200.25,147.5 200.5,147.75 200.496,147.754 200.496,148.5
  region net GSM.GND: 198,150.6 198.1,150.5 198.1,149.925 198.275,149.75 200.442,149.75 200.5,149.692 200.5,147.75 200.25,147.5 197,147.5 196.138,148.362 196.138,149.388 196.35,149.6 196.35,150.475 196.475,150.6
  region net 3.3V: 199.3,126.2 199.8,126.7 200.2,126.7 200.2,125.9 200.1,125.8
  region net NetC204_1: 176.3,141.2 176.3,138.3 174.6,136.6 174,137.2 174,140.7
  region net NetC204_1: 174.3,137.1 176.2,137.1 176.3,137.2 176.3,139.1
  pour cut-out: 179.1,135.7 176.3,135.7 176.3,139.946 179.1,139.946
  pour cut-out: 172.7,146 172.7,141.05 177.15,141.05 177.15,146
  pour cut-out: 172.5,138.991 172.5,148.6 162.555,148.6 162.555,138.991
  pour cut-out: 178.804,143.304 178.804,148.6 172.5,148.6 172.5,143.304
  pour cut-out: 169.461,137.499 169.461,143.741 172.5,143.741 172.5,137.499
  pour cut-out: 162.242,118.272 162.242,115.304 166.286,115.304 166.286,118.272
  pour cut-out: 158.05,118.272 154.7,118.272 154.7,117.164 158.05,117.164
  pour cut-out: 145.696,151.054 145.696,148.554 147.333,148.554 147.333,151.054
  pour cut-out: 190.464,187.354 190.464,180.75 195.141,180.75 195.141,187.354
  pour cut-out: 186.957,180.259 188.641,180.259 188.641,180.807 186.957,180.807
  pour cut-out: 214.496,105.454 214.496,103.088 221.414,103.088 221.414,108.054 214.515,108.054
  pour cut-out: 209.446,181.446 206.5,181.446 206.5,178.809 209.612,178.809 209.612,180.74
  pour cut-out: 206.246,181.546 206.246,179.65 206.612,179.65 206.612,181.546
  pour cut-out: 207.754,181.546 209.612,181.546 209.612,181.25 207.75,181.25
  pour cut-out: 213.446,185.454 214.554,185.454 214.554,188.304 213.446,188.304
  pour cut-out: 208.754,185.454 208.754,188.304 207.446,188.304 207.446,185.454 208.514,185.454
  pour cut-out: 222.6,148.6 222.6,145.9 226.4,145.9 226.4,148.6
  region net GSM.GND: 228.025,147.45 228.025,147.05 224.975,147.05 224.975,147.45
  region net GSM.VBAT: 223.475,163.3 224.125,162.65 224.125,159.2 224.575,158.75 227.575,158.75 227.75,158.575 227.75,156.275 227.65,156.175 222.525,156.175 222.4,156.3 222.4,160.4 222.1,160.7 220.375,160.7 220.2,160.875 220.2,163.125 220.375,163.3
  pour cut-out: 224.75,172.75 224.75,169 228.25,169 228.25,172.75
  pour cut-out: 230.4,181.9 230.4,90.8 251.6,90.8 251.6,181.9
  pour cut-out: 207.9,145.4 207.9,138.514 211.304,138.514 211.304,145.4
  pour cut-out: 210.196,139.707 210.196,133.696 219.557,133.696 219.557,139.707
  pour cut-out: 216.35,149.004 216.054,149.3 215.9,149.3 211.383,144.783 211.383,144.539 211.424,144.497 211.843,144.497
  pour cut-out: 215.989,151.011 216,151 211.688,146.688 204.111,146.688 203.724,147.075 203.724,147.241 203.863,147.241 207.632,151.011
  pour cut-out: 184.8,157.004 184.8,151.8 193.4,151.8 193.4,156.559 192.407,156.559 192.407,157.004
  pour cut-out: 187.196,165.804 187.196,162.904 187.619,162.904 187.619,165.804
  pour cut-out: 225.946,167.896 225.946,161.5 227.054,161.5 227.054,167.896
  pour cut-out: 230.4,161.639 227.054,161.639 227.054,160.361 230.4,160.361
  region net 3.3V: 207.675,115.975 207.75,115.9 211.425,115.9 211.7,115.625 211.7,114.925 211.775,114.85 212.2,114.85 212.325,114.975 212.325,116.65 211.975,117 208.025,117 207.925,117.1 207.925,117.6 207.875,117.65 207.7,117.65 207.675,117.625 207.675,117.225
  pour cut-out: 216.304,114.696 213.638,114.696 213.638,116.685 216.304,116.685
  pour cut-out: 210.196,115.012 210.196,114.591 212.696,114.591 212.696,115.012
  pour cut-out: 216.304,126.054 214.304,126.054 214.304,125.226 216.304,125.226
  region net GND: 184.5,155 185.75,155 185.75,151.25 184.25,151.25 184.25,151.5
  pour cut-out: 189.873,147.89 189.873,146.638 195.75,146.638 195.75,147.89
  pour cut-out: 174.396,90.146 174.396,94.686 178.304,94.686 178.304,90.146 176.604,90.146
  pour cut-out: 151.896,137.185 151.896,136.996 154.096,136.996 154.096,137.185
  pour cut-out: 184.755,180.259 184.755,183.296 185.954,183.296 185.954,180.259
  pour cut-out: 187.154,187.204 187.154,185.496 190.464,185.496 190.464,187.204
  pour cut-out: 190.464,187.354 185.646,187.354 185.646,185.496 190.464,185.496
  pour cut-out: 220.5,177.575 218.875,177.575 218.875,172.388 220.5,172.388
  pour cut-out: 224.946,166.554 219.935,166.554 219.935,165.446 224.946,165.446
  pour cut-out: 222.525,155.916 221.844,155.916 221.844,156.69 222.525,156.69
  pour cut-out: 184.541,157.004 184.541,155 184.8,155 184.8,156.745
  pour cut-out: 174.1,133.941 175.446,133.941 175.446,136.804 174.1,136.804
  region net NetC200_1: 174.6,135.6 173.75,134.75 173.75,130.5 174,130.25 176.25,130.25 176.75,129.75 177.25,130.25 177.25,135.5 177.15,135.6
  pour cut-out: 227.211,160.372 cw(c227.054,161.469) 225.946,161.469 225.946,161.672
Bottom Layer:
  region net VOUT: 192.5,149.5 191.4,149.5 191.2,149.3 191.2,145.9 191.75,145.9 193.05,147.2
  region net VOUT: 193.05,147.2 193.05,149.15 192.7,149.5 192.5,149.5
  region net VOUT: 193.05,147.2 193.05,146.55 191.9,145.4 191.7,145.6 191.7,148.4
  pour cut-out: 210.391,135.399 209.188,135.399 209.188,147.589 212.112,147.589 212.112,136.017
  pour cut-out: 196.25,156.25 197.75,156.25 209.388,146.875 210.65,147.589 200.5,158 196.25,158
  pour cut-out: 201.99,147.03 201.99,151 205.541,151 205.541,147
  region net GND: 184.925,155 185.7,155 185.7,150.9 184.925,150.9
  region net GND: 185.886,151.8 185.886,155 184.5,155 184.5,151.8
  region net GND: 184.925,156.601 185.886,155.64 185.886,155 184,155 183,156

## Silkscreen, mask and mechanical layers (free items; w line width, h text height)
Top Overlay:
  text "LED-" at 183.175,189.275 h3.2
  text "LED+" at 201.675,189.275 h3.2
  text "12V" at 169.701,147.144 h2.5 r90
  text "24V" at 174.277,147.144 h2.5 r90
  text "BAT+" at 143.35,144.45 h2
  text "LED CTRL" at 207.456,132.587 h2 r90
  text "BAT-" at 143.35,131.625 h2
  text "ĐT: 02253759598 - 0913538298" at 240.875,117.192 h3.3 r90
  text "TOP" at 153,113.5 h2
  text "CTY CP THIẾT BỊ BÁO HIỆU HÀNG HẢI MIỀN BẮC" at 233.55,103.685 h3.3 r90
  text "Số 2A/215, Lê Lai, Phường Ngô Quyền, TP Hải Phòng" at 236.941,102.338 h3.2 r90

## Text inside footprints (layer, text, board x,y; h text height)
C503: Top Overlay "+" at 179.992,91.35 h2 r180
P100: Top Overlay "8" at 220.208,110.624 h1.27 r90; Top Overlay "7" at 222.748,110.624 h1.27 r90; Top Overlay "1" at 222.748,99.448 h1.27 r90; Top Overlay "2" at 220.208,98.94 h1.27 r90